# Altium PCB sampler.PcbDoc
Units mm, origin at the board's own origin, x right, y up, seen from the top; angles counter-clockwise.
Board outline 132.46 x 83.57 mm, 2 copper layers (Top Layer, Bottom Layer); 28 components, 25 nets, 97 pads, 1 vias.
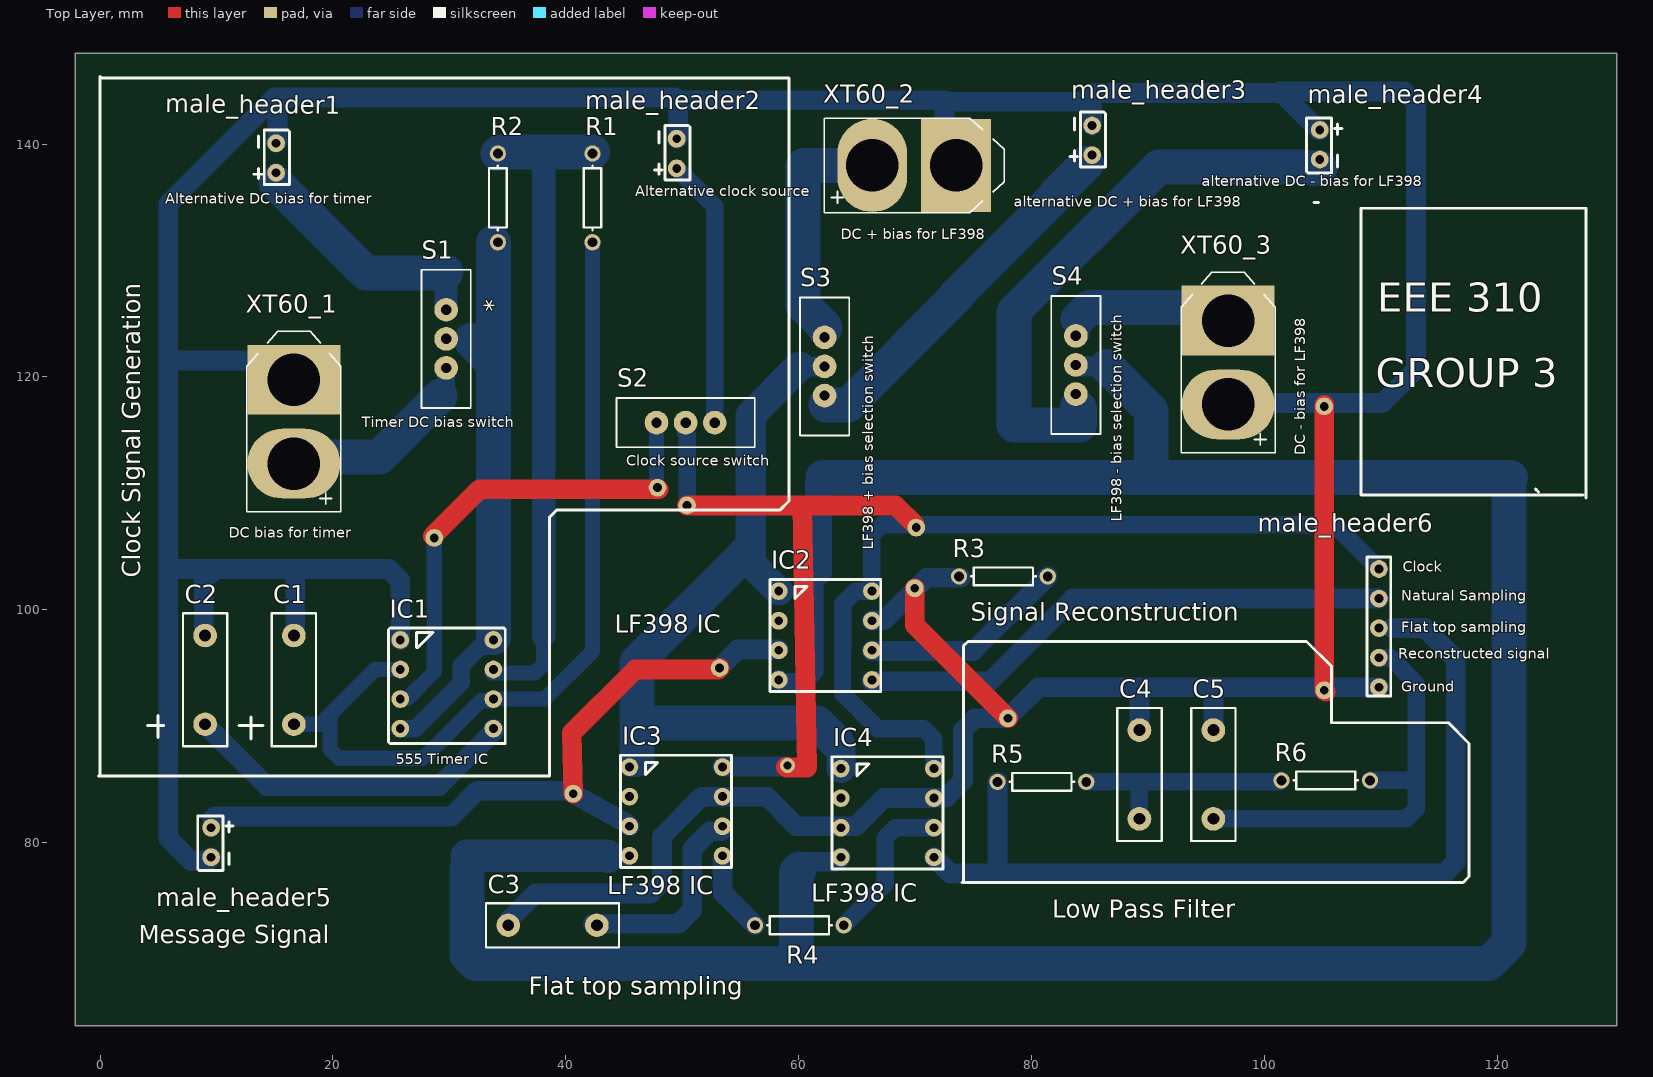
[diagram p0: Top Layer view]
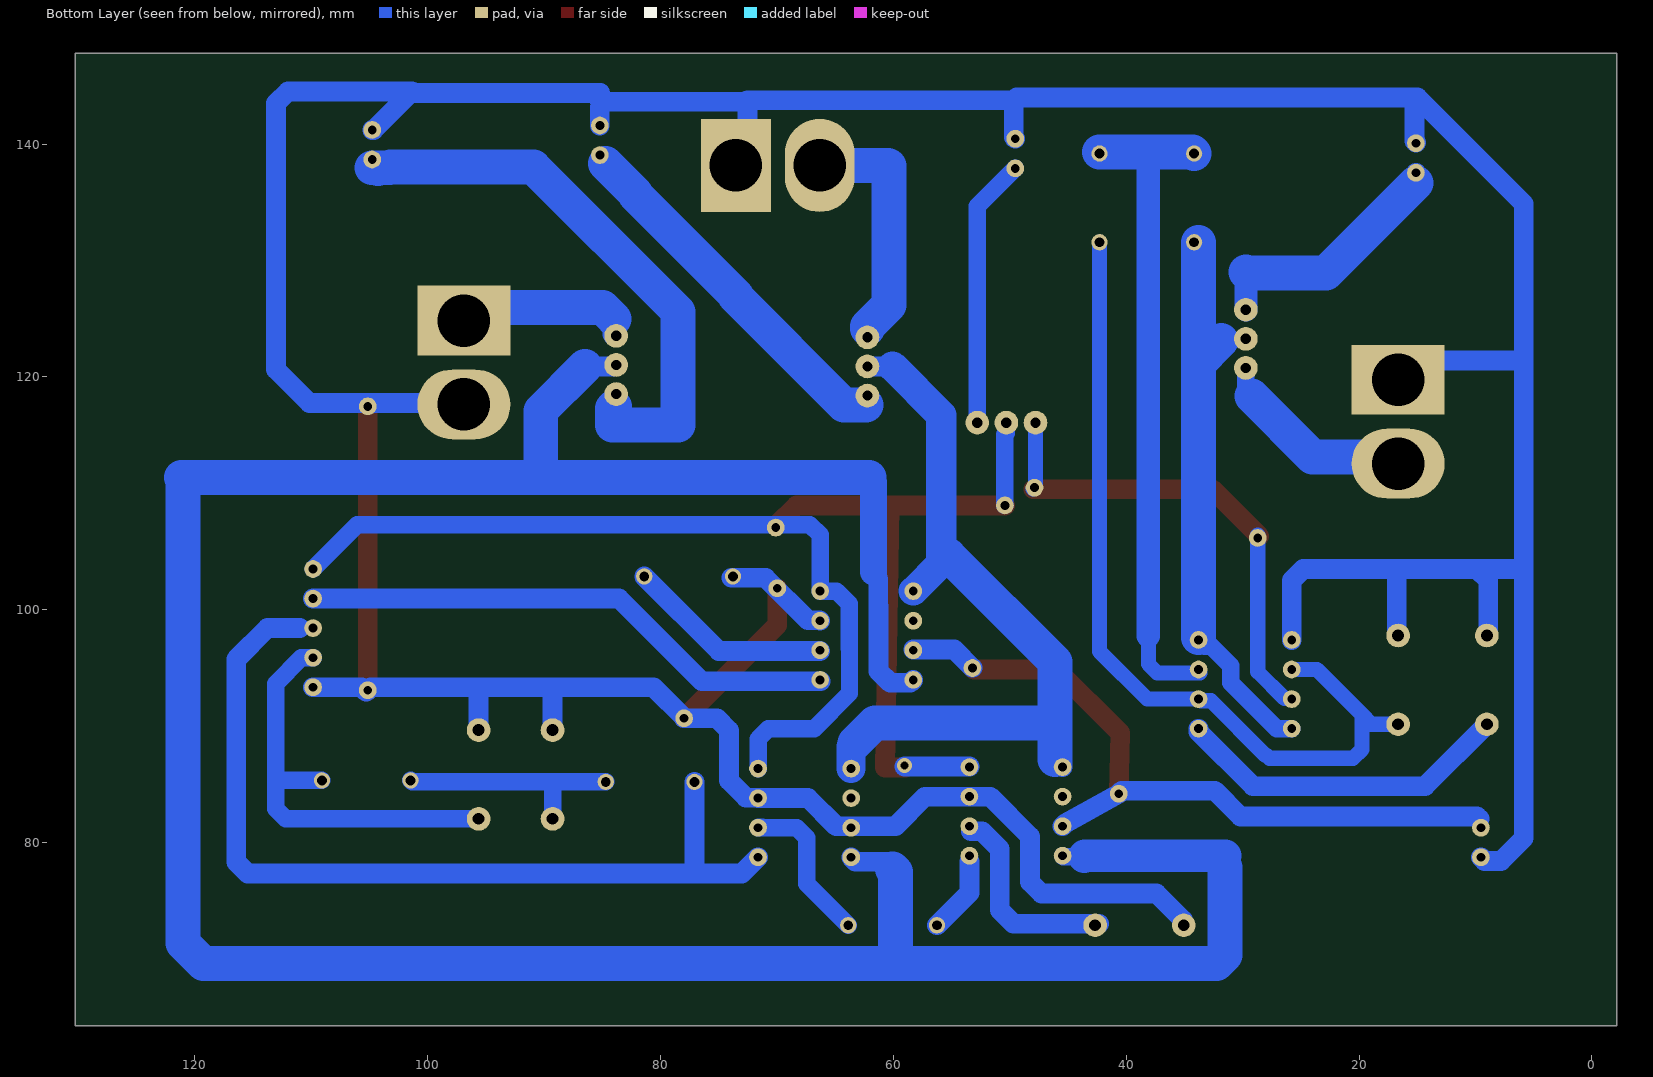
[diagram p1: Bottom Layer view, seen from below]
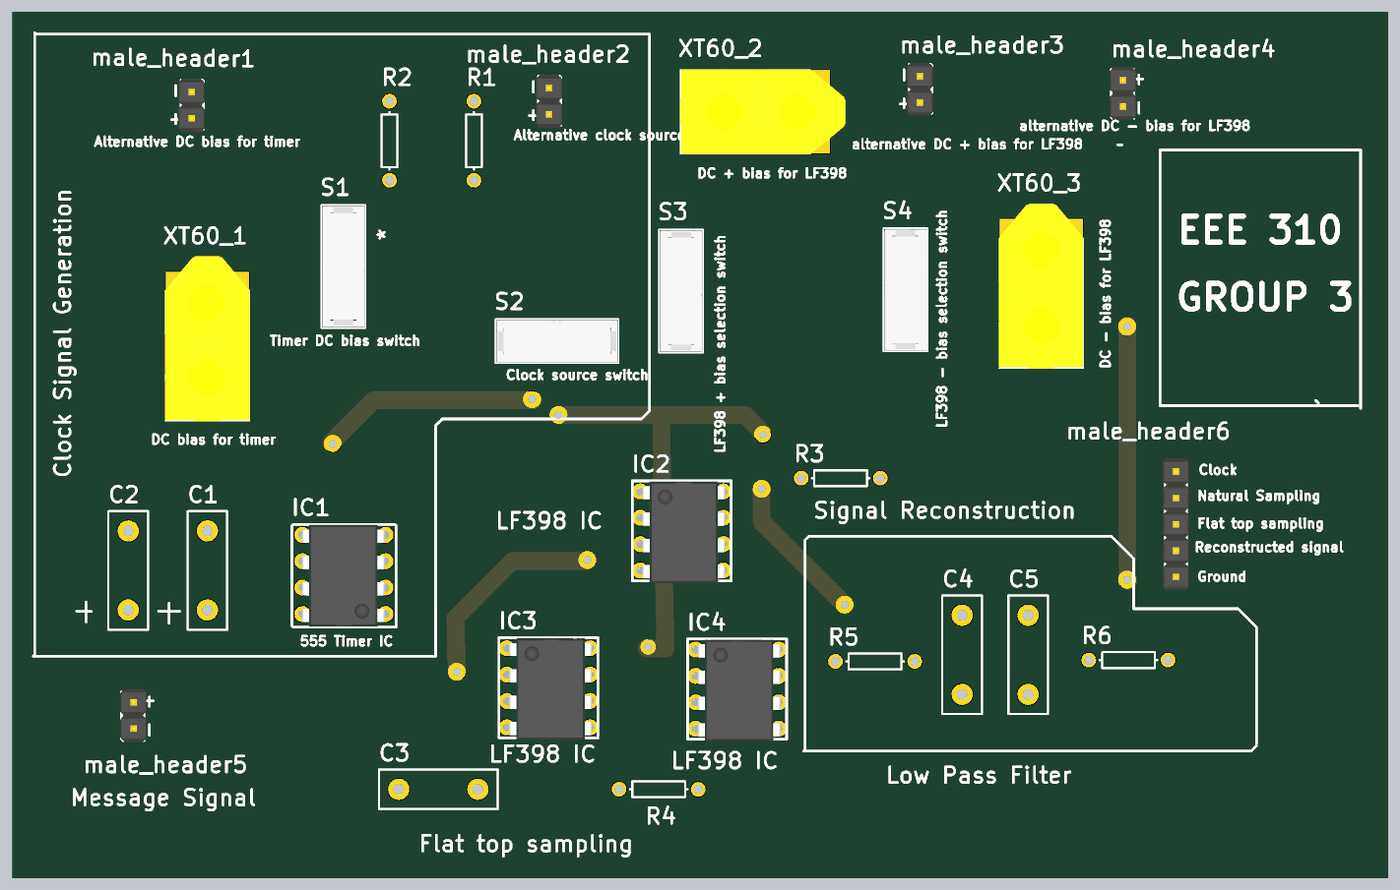
[diagram p2: 3D render of the assembled board from above, using the file's embedded part models]

## Layer stack, top to bottom
Top Solder: solder mask 0.0102, Solder Resist, Dk 3.5
Top Layer: signal copper 0.0356
Dielectric 1: dielectric 0.32, FR-4, Dk 4.8
Bottom Layer: signal copper 0.0356
Bottom Solder: solder mask 0.0102, Solder Resist, Dk 3.5

## Board outline
-2.159,64.262 130.302,64.262 130.302,147.828 -2.159,147.828

## Design rules (kind name [scope] priority, off if disabled: settings)
Clearance [All] p1: gap=0.5 ignorepadtopadclearanceinfootprint=FALSE except(0.3: Fill-Hole Poly-Hole Region-Hole; 0.7: Via-Fill Via-Poly Via-Region; 0.9: Arc-Arc Arc-Track Arc-Fill Arc-Poly Arc-Region Track-Track Track-Fill Track-Poly Track-Region)
PolygonConnect [All] p1: connectstyle=Relief reliefconductorwidth=0.254 reliefentries=4 polygonreliefangle="90 Angle" airgapwidth=0.254
RoutingVias [All] p1: holewidth=0.711 width=1.27 viastyle="Through Hole" minholewidth=0.711 minwidth=1.27 maxholewidth=0.711 maxwidth=1.27
SolderMaskExpansion [All] p1: expansion=0.102 istentingtop=FALSE
Width [All] p1: maxlimit=3 minlimit=1.3 preferedwidth=2 toplayer_minwidth=1.7 bottomlayer_prefwidth=1.3 minimp=50.000000 maximp=50.000000 favimp=50.000000
30 further rules are at their usual default settings.

## Components (designator, comment, footprint, x,y, rotation, side; value= is the part's Value field where it differs from the comment)
C1 "Cap" RAD-0.3 16.637,93.98 r90 top value=1nF
C2 "Cap" RAD-0.3 9.017,93.98 r270 top value=0.1uF
C3 "Cap" RAD-0.3 38.862,72.898 r0 top value=0.01uF
C4 "Cap" RAD-0.3 89.281,85.852 r270 top value=1uF
C5 "Cap" RAD-0.3 95.631,85.852 r270 top value=1uF
IC1 "555 timer ic" 555timer_ic 25.781,97.409 r270 top
IC2 "1st LF398 IC" LF_398_IC 58.293,101.6 r270 top
IC3 "2nd LF398 IC" LF_398_IC 45.466,86.487 r270 top
IC4 "3rd LF398 IC" LF_398_IC 63.627,86.36 r270 top
male_header1 "alternative bias for timer using lab dc source" 2pin_header 15.113,140.081 r270 top
male_header2 "in case timer doesnt work" 2pin_header 49.53,140.462 r270 top
male_header3 "alternative bias for LF398 using lab dc source" 2pin_header 85.217,141.605 r270 top
male_header4 "alternative bias for LF398 using lab dc source" 2pin_header 104.775,138.684 r90 top
male_header5 "message signal input" 2pin_header 9.525,78.74 r90 top
male_header6 "oscilloscpoe output" 5pin_male_header 109.855,103.505 r270 top
R1 "Res1" AXIAL-0.3 42.291,135.382 r90 top value=47K
R2 "Res1" AXIAL-0.3 34.163,135.382 r270 top value=10K
R3 "Res1" AXIAL-0.3 77.597,102.87 r180 top value=47K
R4 "Res1" AXIAL-0.3 60.071,72.898 r180 top value=47K
R5 "Res1" AXIAL-0.3 80.899,85.217 r0 top value=220
R6 "Res1" AXIAL-0.3 105.283,85.344 r0 top value=220
S1 "SWITCH SPDT-switch between timer dc bias" EG1218 29.718,120.777 r180 top
S2 "SWITCH SPDT" EG1218 47.792,116.078 r90 top
S3 "SWITCH SPDT-switch between LF398 + dc bias" EG1218 62.23,123.404 r0 top
S4 "SWITCH SPDT-switch between tlf398 - dc bias" EG1218 83.82,123.531 r0 top
XT60_1 "DC bias for timer" "XT60 FEMALE" 16.637,119.761 r270 top
XT60_2 "DC + bias for LF398" "XT60 FEMALE" 73.533,138.176 r180 top
XT60_3 "DC - bias for LF398" "XT60 FEMALE" 96.901,124.841 r270 top

## Footprints (in the part's own frame and the unit in brackets; to place one, negate y for a bottom-side part, rotate by r counter-clockwise, add the part's x,y. Pads: shape width x height; smd on the part's side, far side on the other; paste and mask are expansions set on the pad)
2pin_header [mil]
  round 60 hole 30: 1(0,0) 2(100,0)
  silkscreen extent -45,-75 140,45, body extent -50,-50 150,50, height 374
5pin_male_header [mil]
  round 60 hole 30: 1(0,0) 2(100,0) 3(200,0) 4(300,0) 5(400,0)
  silkscreen extent -40,-40 430,40, body extent -50,-50 450,50, height 374
555timer_ic [mil] "DIP 8"
  round 60 hole 30: 1(0,0) 2(100,0) 3(200,0) 4(300,0) 5(300,314.96) 6(200,314.96) 7(100,314.96) 8(0,314.96)
  silkscreen extent -40,-40 350,355, body extent -38,-25 348,335, height 63
AXIAL-0.3 [mm] "Axial Device, Thru-Hole; 2 Leads; 0.3 in Pin Spacing"
  round 1.4 hole 0.85: 1(-3.81,0) 2(3.81,0)
  silkscreen extent -2.77,-0.76 2.77,0.76
EG1218 [mil]
  round 80 hole 35 mask+0: 1(0,0) 2(0,-98.43) 3(0,-196.85)
  silkscreen extent -84,-332 84,135, body extent -79,-327 79,130, height 276
LF_398_IC [mil]
  round 60 hole 30: 1(0,0) 2(100,0) 3(200,0) 4(300,0) 5(300,315) 6(200,315) 7(100,315) 8(0,315)
  silkscreen extent -40,-30 340,345, body extent -38,-15 348,345, height 63
RAD-0.3 [mil] "Radial Cap, Thru-Hole; 2 Leads; 0.3 in Pin Spacing"
  round 80 hole 40: 1(-150,0) 2(150,0)
  silkscreen extent -225,-75 225,75
"XT60 FEMALE" [mm]
  rect 6x8 hole 4.5: 1(0,0)
  oval 6x8 hole 4.5: 2(7.2,0)
  silkscreen extent -4.15,-4.05 11.35,4.05, body extent -4.5,-4.08 11.4,4.07, height 17.5

## Part data
C1 C2 C3 C4 C5: "Capacitor", LatestRevisionDate=17-Jul-2002, LatestRevisionNote="Re-released for DXP Platform.", PackageDescription="Radial Cap, Thru-Hole; 2 Leads; 0.3 in Pin Spacing", PackageReference=RAD-0.3, Published=8-Jun-2000, Publisher="Altium Limited"
IC1: library part Component_1, "555timer ic dip"
IC2 IC3 IC4: library part Component_1, "LF398 IC"
male_header1 male_header2 male_header3 male_header4 male_header5: library part Component_1, "2 pin header"
male_header6: library part Pin?, "male header 5 pin"
R1 R2 R3 R4 R5 R6: "Resistor", LatestRevisionDate=17-Jul-2002, LatestRevisionNote="Re-released for DXP Platform.", PackageDescription="Axial Device, Thru-Hole; 2 Leads; 0.3 in Pin Spacing", PackageReference=AXIAL-0.3, Published=8-Jun-2000, Publisher="Altium Limited"
S1 S3 S4: library part "SWITCH SPDT", "EG1218 SWITCH SLIDE SPDT 200MA 30V"
S2: "EG1218 SWITCH SLIDE SPDT 200MA 30V"
XT60_1 XT60_2 XT60_3: library part "XT60 FEMALE", "CONNECTOR"

## Free pads (board coordinates)
  round 1.524 hole 0.762: 2(69.977,101.854) 3(77.978,90.678) 4(28.702,106.172) 5(47.879,110.49) 6(50.419,108.966) 7(70.104,107.061) 8(53.213,94.996) 9(40.64,84.201) 10(105.156,117.475) 11(105.156,93.091)

## Via types
v1: diameter 1.27, hole 0.711, Top Layer to Bottom Layer, 1 vias

## Nets (pads, with @x,y where several pads share a name; then routed paths per layer and width w, separated by ;. In a path a pad name is that pad's centre, name@x,y a point inside that pad or via, vN(x,y) a via of type N, cw(c..) or ccw(c..) an arc to the next point about the centre after c; other vN are vias at no path point)
"1st lf398 output": IC2.5 male_header6.2 | length 46.5
  Bottom Layer w1.7: IC2.5@66.271,93.853 76.454,93.853 83.566,100.965 male_header6.2
"1st lf398 pin 3": IC2.3 IC3.3 male_header5.2 pad.8 pad.9 | length 63.7
  Top Layer w1.7: pad.9 40.513,89.408 45.974,94.869 53.086,94.869 pad.8
  Bottom Layer w1.7: 9.652,82.042 9.859,82.249 30.179,82.249 32.385,84.455 40.386,84.455 pad.9 45.212,81.661 IC3.3 ; pad.8@53.198,95.011 54.766,96.58 IC2.3@58.293,96.58
"2nd LF398 output": IC3.5 R4.2 | length 6.6
  Bottom Layer w1.7: IC3.5@53.467,78.379 53.467,75.692 R4.2
"3rd LF398 output": IC4.5 male_header6.3 R5.1 | length 77.7
  Bottom Layer w1.7: IC4.5 73.025,77.343 77.089,77.343 ; R5.1 77.089,77.343 ; 110.995,98.428 113.779,98.428 116.459,95.748 116.459,78.339 115.463,77.343 77.089,77.343
"alt V+": male_header3.2 S3.3 | length 31.3
  Bottom Layer w2.5: 73.481,126.948 73.608,126.948
  Bottom Layer w3: S3.3@62.357,117.602 64.262,117.602 73.608,126.948 ; 73.481,126.948 82.169,135.636 82.169,135.763 84.737,138.331
"alt V-": male_header4.1 S4.3 | length 48.6
  Bottom Layer w3: 83.947,117.475 84.147,117.275 84.147,115.878 78.486,115.878 78.486,125.603 90.932,138.049 103.227,138.049 103.302,137.974 104.215,137.974 104.267,137.922 104.319,137.974 male_header4.1@104.775,137.974
clock: IC2.8 IC3.8 IC4.8 male_header6.1 pad.6 pad.7 S2.2 | length 130.3
  Top Layer w1.7: pad.6 60.308,108.966 ; v1@58.928,86.487 58.971,86.444 60.714,86.444 60.308,108.966 ; pad.7@69.977,107.315 68.326,108.966 60.308,108.966
  Bottom Layer w1.5: S2.2 50.292,115.184 50.419,115.057 pad.6 ; IC4.8 71.628,88.901 70.749,89.78 66.808,89.78 63.771,92.817 63.771,96.651 63.794,96.674 63.794,100.507 64.887,101.6 IC2.8 66.294,106.436 67.173,107.315 106.045,107.315 male_header6.1
  Bottom Layer w1.7: IC3.8@53.467,86.547 v1@59.055,86.547
  other v1: 59.055,86.614
clock_2: male_header2.2 S2.3 | length 23.2
  Bottom Layer w1.5: male_header2.2 52.792,134.66 S2.3
GND: C1.2 C2.1 C3.1 C4.1 C5.1 IC1.1 IC2.7 IC3.7 IC4.3 IC4.7 male_header1.1 male_header2.1 male_header3.1 male_header4.2 male_header5.1 male_header6.5 pad.2 pad.3 pad.10 pad.11 R3.2 XT60_1.1 XT60_2.1 XT60_3.2 | length 426.8
  Top Layer w1.7: pad.2 69.977,98.679 pad.3 ; pad.10@105.156,117.602 pad.10 pad.11 pad.11@105.283,92.964
  Bottom Layer w1.7: 6.223,103.505 9.886,103.505 ; C2.1 8.89,97.917 8.89,102.509 9.886,103.505 ; male_header5.1 9.213,78.428 7.805,78.428 5.842,80.391 5.842,103.505 5.842,121.412 ; male_header1.1@15.113,140.154 15.24,140.281 15.24,144.018 ; C1.2 16.764,97.917 16.764,103.505 ; XT60_1.1 14.986,121.412 5.842,121.412 ; IC1.1 25.781,102.509 24.785,103.505 16.764,103.505 ; C3.1 35.116,72.962 35.116,73.343 37.398,75.625 47.271,75.625 48.267,76.621 48.267,80.533 51.681,83.947 57.277,83.947 59.817,81.407 64.912,81.407 67.325,83.82 IC4.7 71.668,83.86 72.664,83.86 74.128,85.324 74.128,89.642 75.164,90.678 pad.3 ; male_header2.1 49.657,140.589 49.657,143.764 ; IC2.7 66.334,99.1 67.33,99.1 70.973,102.743 R3.2@73.901,102.743 ; 72.537,143.637 85.217,143.637 ; XT60_2.1 72.537,139.172 72.537,143.764 49.657,143.764 ; pad.3@77.958,90.698 80.605,93.345 89.281,93.345 ; male_header3.1 85.217,143.163 85.188,143.192 85.188,144.399 101.473,144.399 ; C4.1 89.281,93.345 ; C5.1 95.631,93.345 ; XT60_3.2@96.911,117.758 105.156,117.758 110.158,117.758 113.03,120.63 113.03,143.51 112.014,144.526 101.346,144.526 104.648,141.224 male_header4.2 ; male_header6.5 105.664,93.345 105.283,92.964 pad.11 104.902,93.345 95.631,93.345 ; 5.842,121.412 5.842,134.874 14.986,144.018 15.24,144.018 ; 9.886,103.505 16.764,103.505 ; 15.24,144.018 49.403,144.018 49.657,143.764 ; 89.281,93.345 95.631,93.345
"LPF output": C5.2 male_header6.4 R6.2 | length 36.7
  Bottom Layer w1.5: C5.2@95.758,81.915 95.885,82.042 112.191,82.042 113.07,82.921 113.07,85.09 ; R6.2 112.816,85.344 113.07,85.09 ; male_header6.4 109.86,95.88 110.855,95.88 113.07,93.666 113.07,85.09
"main V+": S3.1 XT60_2.2 | length 20.8
  Bottom Layer w1.7: S3.1@62.318,123.532 62.294,123.557 S3.1@62.357,123.621
  Bottom Layer w3: S3.1@62.23,124.154 62.23,124.333 60.389,126.174 60.389,138.112 60.452,138.176 XT60_2.2
"main V-": S4.1 XT60_3.1 | length 15.2
  Bottom Layer w2: S4.1@83.884,123.684 S4.1@83.986,123.787 ; S4.1@83.986,123.698 S4.1@83.986,123.787 ; 83.986,124.988 S4.1@83.986,123.787 ; XT60_3.1@95.758,125.984 XT60_3.1
  Bottom Layer w3: 83.986,124.988 84.982,125.984 XT60_3.1@95.758,125.984
NetC2_2: C2.2 IC1.5 | length 29.2
  Bottom Layer w1.7: C2.2 14.338,84.849 29.102,84.849 33.781,89.528 IC1.5
NetC3_2: C3.2 IC3.6 | length 17.4
  Bottom Layer w1.7: C3.2@42.327,73.025 49.67,73.025 50.867,74.222 50.867,79.456 52.39,80.979 IC3.6@53.34,80.979
NetC4_2: C4.2 R5.2 R6.1 | length 20
  Bottom Layer w1.5: R5.2 89.281,85.217 ; C4.2 89.281,85.217 ; R6.1 101.346,85.217 89.281,85.217
NetIC2_6: IC2.6 R3.1 | length 17.8
  Bottom Layer w1.7: IC2.6@66.294,96.46 74.997,96.46 R3.1
NetIC4_6: IC4.6 R4.1 | length 13.9
  Bottom Layer w1.5: R4.1 67.437,76.454 67.437,80.397 68.316,81.275 71.623,81.275 IC4.6 71.588,81.32 IC4.6@71.247,81.32
timer_pin2: C1.1 IC1.2 IC1.6 R1.1 | length 75.8
  Bottom Layer w1.3: C1.1 18.923,90.17 19.749,90.995 ; IC1.2 23.622,94.869 19.749,90.995 ; IC1.6@33.72,92.329 33.58,92.189 32.718,92.189 28.022,87.494 27.931,87.494 27.686,87.249 20.51,87.249 19.749,88.011 19.749,90.995 ; IC1.6 38.198,92.329 42.291,96.422 R1.1
timer_pin3: IC1.3 pad.4 pad.5 S2.1 | length 42.5
  Top Layer w1.7: pad.4@28.563,106.32 32.606,110.363 pad.5@47.992,110.363
  Bottom Layer w1.3: IC1.3 25.824,92.372 26.395,92.372 28.702,94.679 pad.4 pad.4@28.702,106.426 ; S2.1 47.792,110.563 pad.5@47.992,110.363
timer_pin7: IC1.7 R1.2 R2.1 | length 56.9
  Bottom Layer w1.3: IC1.7@33.655,94.581 37.338,94.581 38.1,95.343 38.1,97.74
  Bottom Layer w2: 38.1,97.74 38.1,139.319
  Bottom Layer w3: R2.1 34.29,139.319 38.1,139.319 R1.2@42.288,139.319
V+: IC2.1 IC3.1 IC4.1 S3.2 | length 70.7
  Bottom Layer w1.7: IC3.1 45.466,89.535 46.212,90.281 ; 55.245,104.648 55.88,104.013 ; 60.071,120.904 S3.2
  Bottom Layer w2.5: 55.88,104.013 IC2.1 ; 63.305,88.578 63.627,88.255 IC4.1
  Bottom Layer w2.6: 55.88,104.013 55.88,116.713 60.071,120.904
  Bottom Layer w3: 46.101,87.122 46.101,89.535 46.101,95.504 55.245,104.648 ; 46.212,90.281 61.602,90.281 63.305,88.578
V-: IC2.4 IC3.4 IC4.4 S4.2 | length 259.5
  Bottom Layer w1.5: 31.496,77.851 31.496,78.796 31.496,79.05 ; 43.62,78.799 45.391,78.799 45.46,78.867 IC3.4
  Bottom Layer w1.7: IC2.4 58.547,93.726 60.275,93.726 61.271,94.722 61.271,100.335 61.294,100.358 61.294,102.634 61.811,103.151 ; 60.071,77.744 60.686,78.359 63.246,78.359 IC4.4 ; S4.2@84.115,120.904 86.487,120.904 ; 89.408,110.998 90.297,111.887
  Bottom Layer w2: 61.705,103.257 61.811,103.151
  Bottom Layer w2.3: 61.705,103.257 61.705,110.981 62.103,111.379
  Bottom Layer w2.5: 43.62,78.799 43.682,78.861 43.694,78.861
  Bottom Layer w2.8: 31.496,78.867 43.551,78.867 43.62,78.799
  Bottom Layer w3: 31.496,77.851 31.496,70.337 32.237,69.596 59.817,69.596 ; 60.071,77.744 59.817,77.49 59.817,69.596 ; 62.103,111.379 121.158,111.379 ; 86.487,120.904 90.297,117.094 90.297,111.887 ; 121.031,111.379 121.031,71.353 119.274,69.596 59.817,69.596
vcc: IC1.4 IC1.8 R2.2 S1.2 | length 50.9
  Bottom Layer w1.3: S1.2@29.544,123.19 31.76,123.19 31.834,123.116
  Bottom Layer w1.5: IC1.4 25.786,89.794 27.07,89.794 31.002,93.726 31.002,95.181 32.702,96.881 32.788,96.881 33.247,96.881 33.775,97.409 IC1.8
  Bottom Layer w3: 31.834,123.116 33.781,121.169 ; IC1.8@33.781,97.631 33.781,121.169 ; R2.2@33.781,131.339 33.781,121.169 ; R2.2@33.782,131.445 R2.2@33.782,131.572
vcc1: S1.1 XT60_1.2 | length 17.6
  Bottom Layer w1.5: 29.218,118.364 29.718,118.864 S1.1
  Bottom Layer w3: XT60_1.2 17.211,113.135 23.989,113.135 29.218,118.364
vcc2: male_header1.2 S1.3 | length 22
  Bottom Layer w1.7: 15.113,136.652 male_header1.2
  Bottom Layer w2: S1.3 29.718,127.698 29.718,129.032
  Bottom Layer w3: 15.113,136.652 22.824,128.941 29.627,128.941 29.718,129.032
pads on no net: IC2.2 IC3.2 IC4.2

## Silkscreen, mask and mechanical layers (free items; w line width, h text height)
Top Overlay:
  lines w0.254: 0,145.669 59.182,145.669 59.182,109.347 58.42,108.585 39.243,108.585 38.608,107.95 38.608,86.868 38.608,85.725 2.286,85.725 -0.127,85.725 0,85.852 0,145.796 0.127,145.669 ; 4.064,90.043 5.461,90.043 ; 4.953,89.027 4.953,90.932 ; 11.938,90.043 13.97,90.043 ; 12.954,88.9 12.954,90.805 ; 74.041,76.581 117.094,76.581 117.602,77.089 117.602,88.519 115.824,90.297 105.791,90.297 105.791,95.123 103.632,97.282 74.549,97.282 74.168,96.901 74.168,76.708 ; 104.267,135.001 104.648,135.001 ; 123.317,110.363 123.571,110.109 ; 127.381,109.855 108.331,109.855 108.331,134.493 127.635,134.493 127.635,109.601
  text "alternative DC - bias for LF398" at 94.615,136.398 h0.9
  text "Alternative clock source" at 45.974,135.509 h0.9
  text "Alternative DC bias for timer" at 5.588,134.874 h0.9
  text "alternative DC + bias for LF398" at 78.486,134.62 h0.9
  text "DC + bias for LF398" at 63.627,131.826 h0.9
  text "*" at 34.544,125.603 h1.52 r90
  text "EEE 310" at 109.72,125.595 h2.5
  text "GROUP 3" at 109.593,119.118 h2.5
  text "Timer DC bias switch" at 22.479,115.697 h0.9
  text "DC - bias for LF398" at 103.505,113.284 h0.9 r90
  text "Clock source switch" at 45.212,112.395 h0.9
  text "LF398 - bias selection switch" at 87.757,107.569 h0.9 r90
  text "DC bias for timer" at 11.049,106.172 h0.9
  text "LF398 + bias selection switch" at 66.421,105.156 h0.9 r90
  text "Clock" at 111.887,103.251 h0.9
  text "Clock Signal Generation" at 3.429,102.743 h1.52 r90
  text "Natural Sampling" at 111.76,100.757 h0.9
  text "Signal Reconstruction" at 74.803,99.06 h1.52
  text "Flat top sampling" at 111.76,98.09 h0.9
  text "LF398 IC" at 44.196,98.044 h1.52
  text "Reconstructed signal" at 111.506,95.804 h0.9
  text "Ground" at 111.76,92.964 h0.9
  text "555 Timer IC" at 25.4,86.741 h0.9
  text "LF398 IC" at 43.561,75.565 h1.52
  text "LF398 IC" at 61.087,74.93 h1.52
  text "Low Pass Filter" at 81.788,73.533 h1.52
  text "Message Signal" at 3.302,71.374 h1.52
  text "Flat top sampling" at 36.83,66.929 h1.52